# Altium PCB Industrial_IOT_Dev_Brd-v2.0.PcbDoc (part 1 of 5)
Units mil, origin at the board's own origin, x right, y up, seen from the top; angles counter-clockwise.
Board outline 3543.31 x 4724.41 mil, 2 copper layers (Top Layer, Bottom Layer), stack 61.889 mil thick; 159 components, 96 nets, 479 pads, 141 vias.
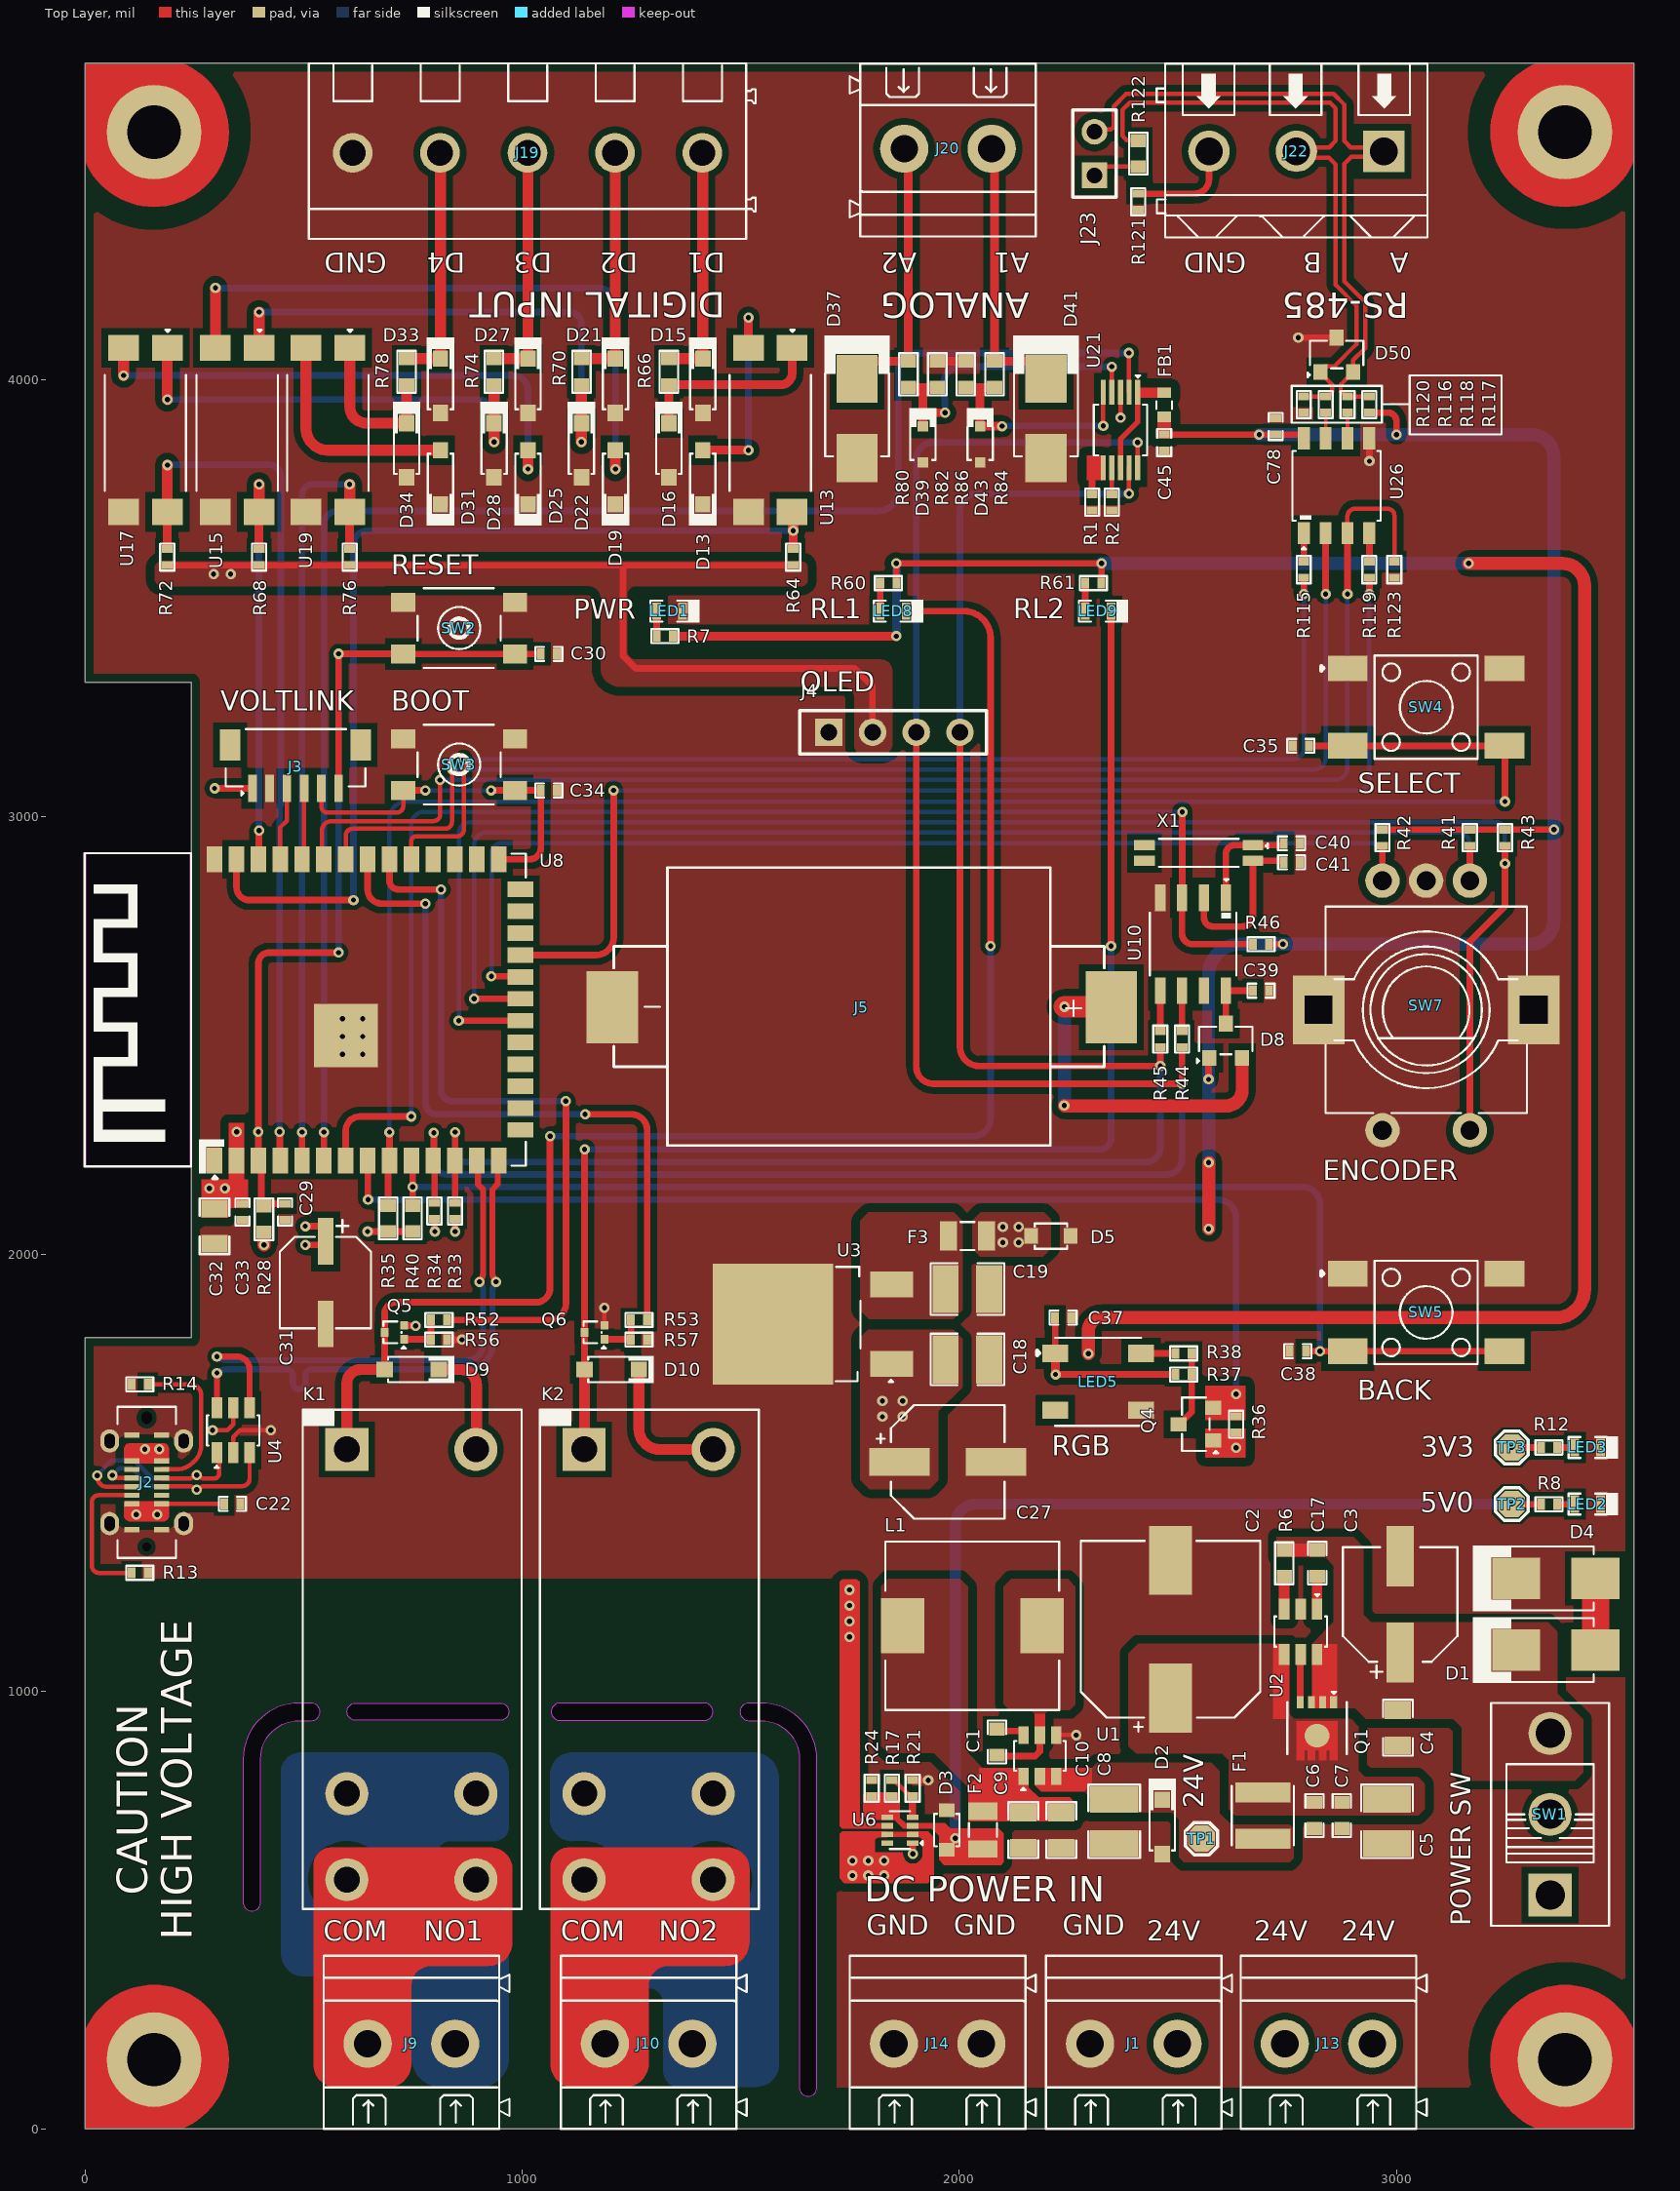
[diagram p0: Top Layer view]
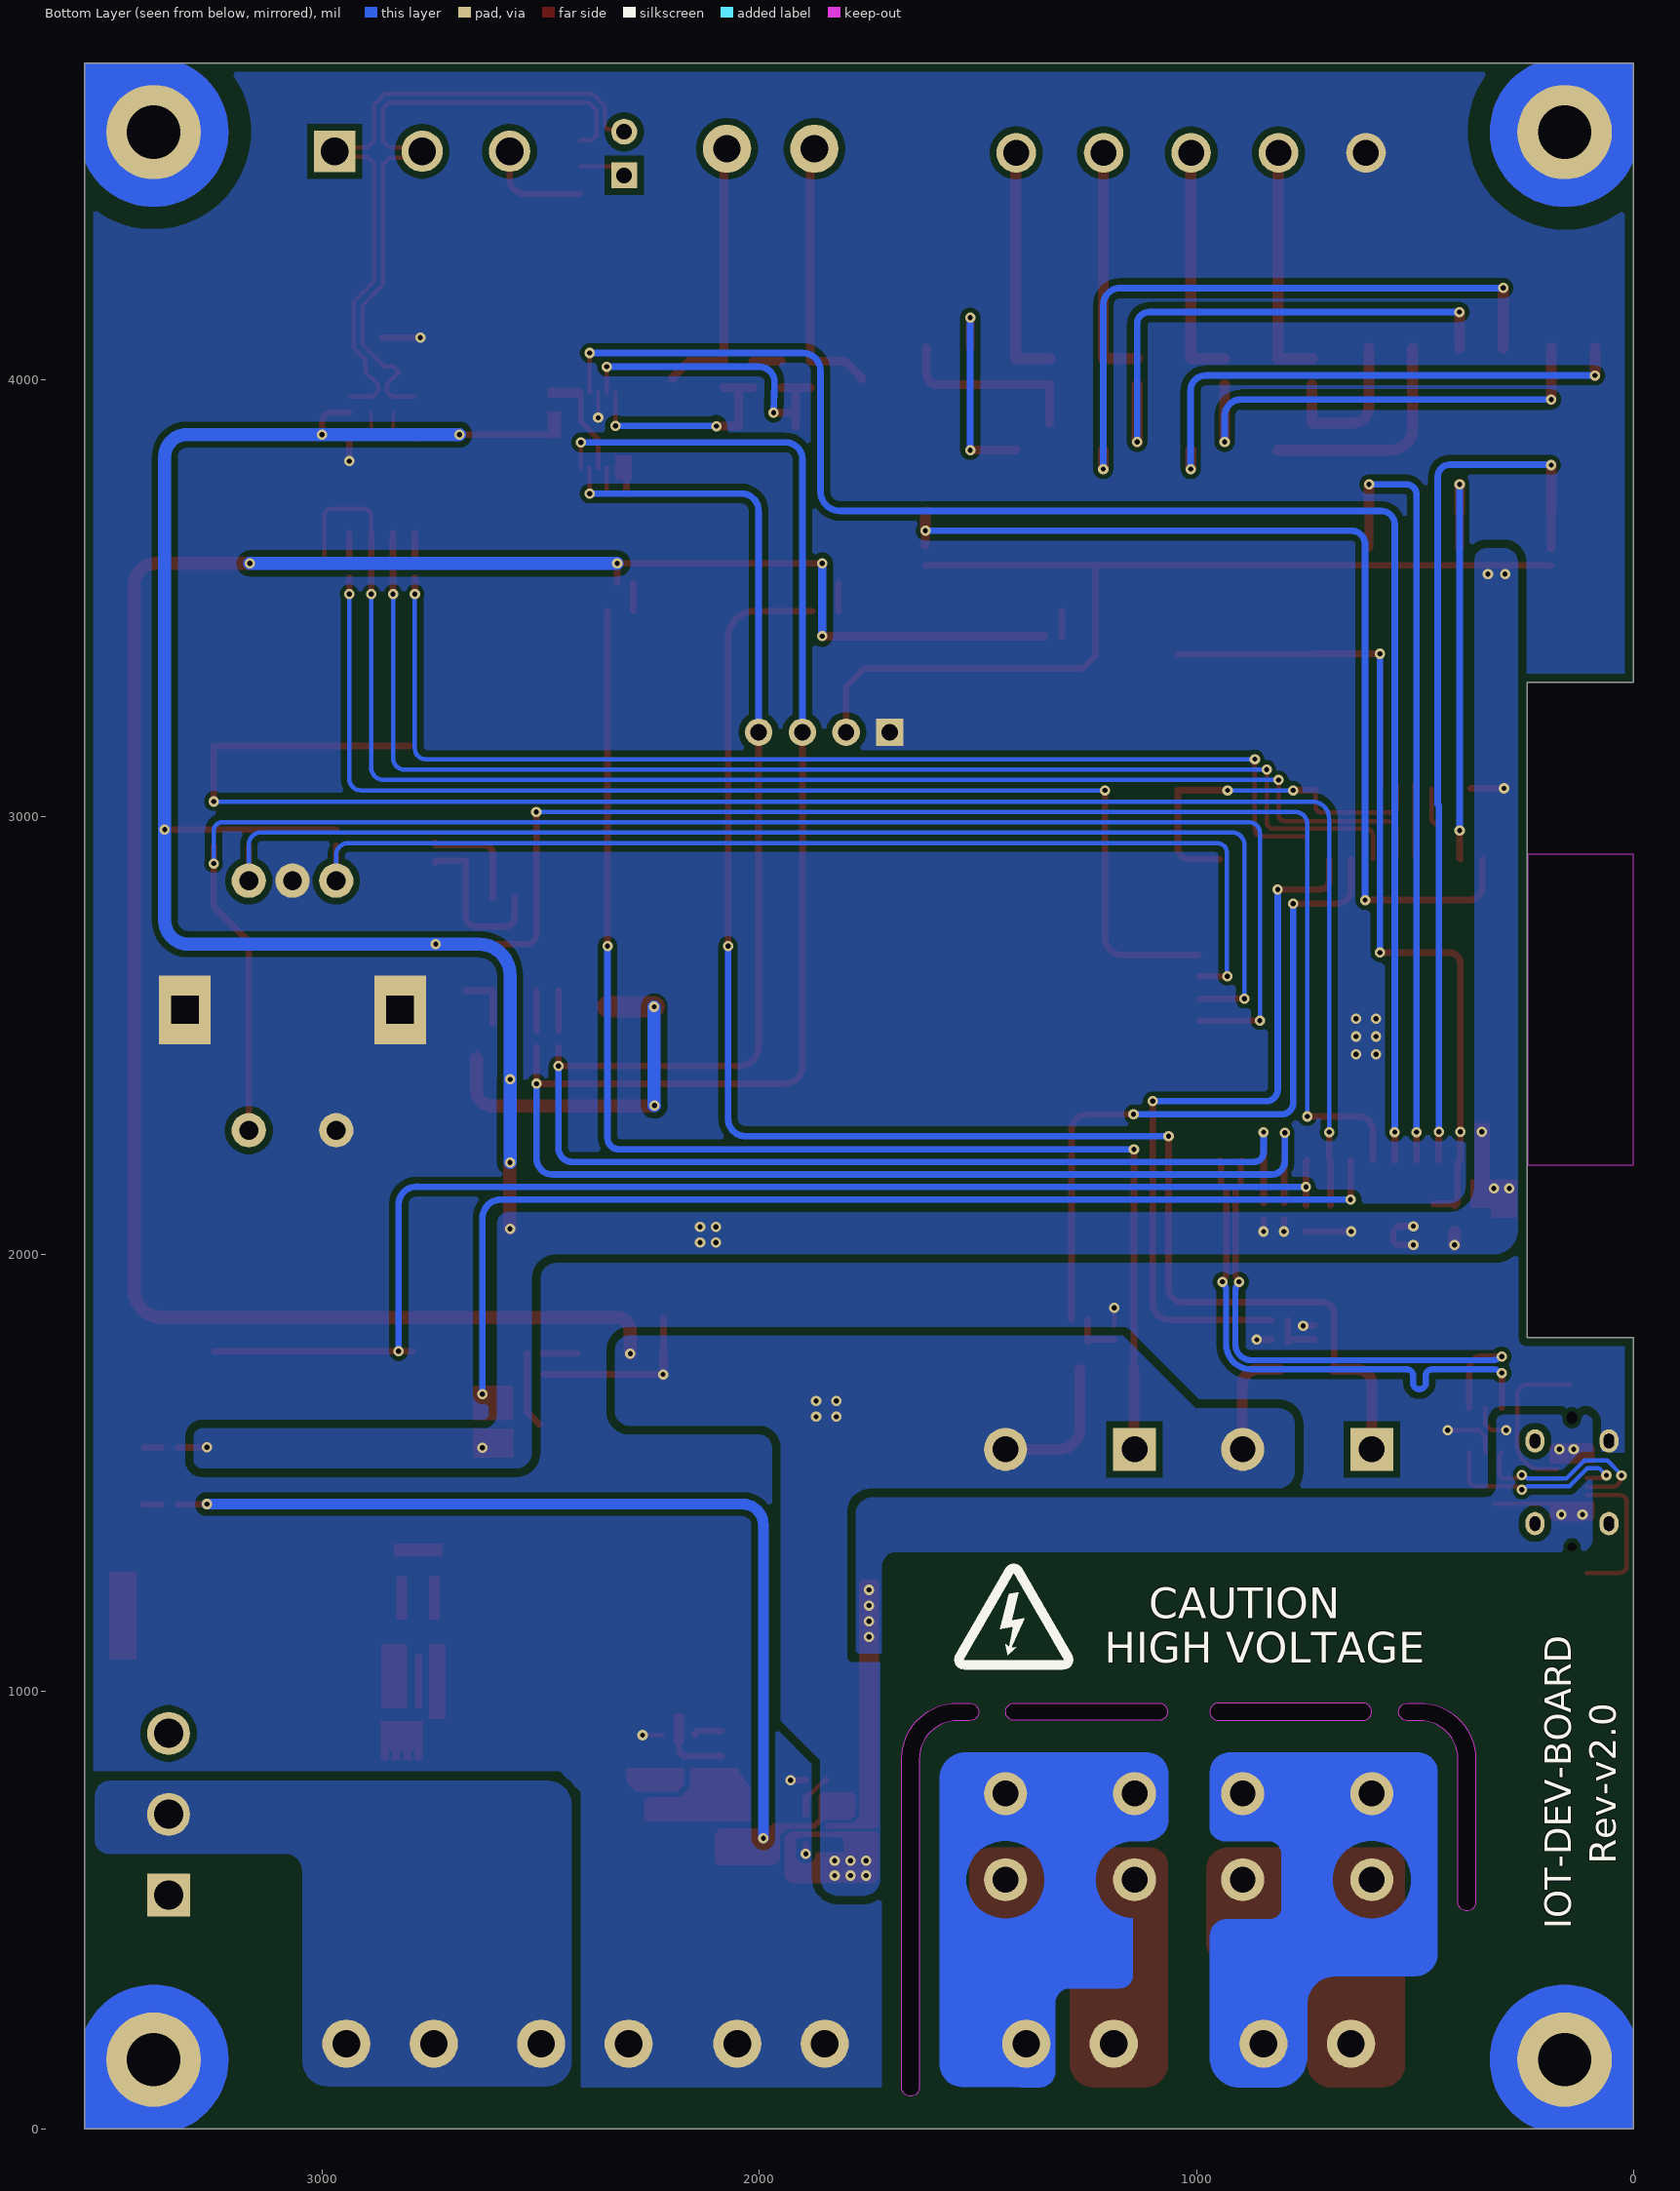
[diagram p1: Bottom Layer view, seen from below]
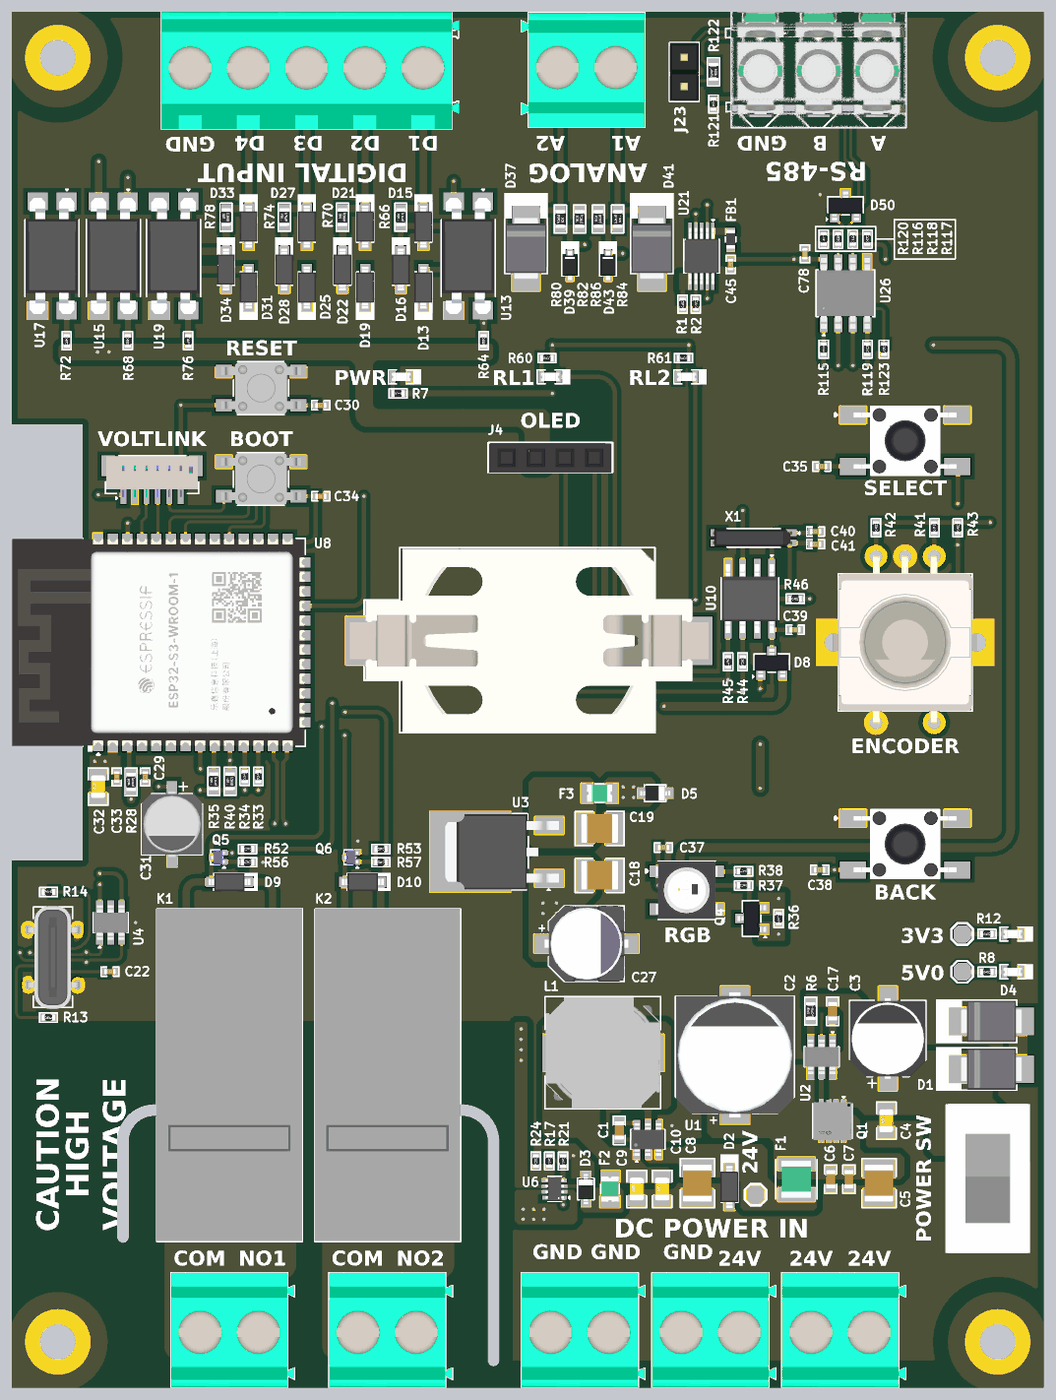
[diagram p4: 3D render of the assembled board from above, using the file's embedded part models]

## Layer stack, top to bottom
Top Solder: solder mask 1, SM-001, Dk 4.8
Top Layer: signal copper 1.417
Dielectric 1: dielectric 59.055, FR-4, Dk 4.8
Bottom Layer: signal copper 1.417
Bottom Solder: solder mask 1, SM-001, Dk 4.8

## Board outline
0,0 0,1809.66 243.39,1809.66 243.39,3308.25 0,3308.25 0,4724.41 3543.31,4724.41 3543.31,0
cut-out: 1498.22,952.93 ccw(c1517.91,952.93) 1517.91,933.25 1546.35,933.25 cw(c1546.35,845.5) 1634.1,845.5 1634.1,94.01 ccw(c1654.12,94.01) 1654.12,73.99 ccw(c1654.12,94.01) 1674.13,94.01 1674.13,845.5 ccw(c1546.35,845.5) 1546.35,973.28 1518.57,973.28 ccw(c1518.57,952.93)
cut-out: 361.62,517.71 ccw(c381.64,517.71) 381.64,497.69 ccw(c381.64,517.71) 401.65,517.71 401.65,845.5 cw(c489.4,845.5) 489.4,933.25 517.85,933.25 ccw(c517.85,952.93) 537.53,952.93 ccw(c517.19,952.93) 517.19,973.28 489.4,973.28 ccw(c489.4,845.5) 361.62,845.5
cut-out: 969.23,953.51 cw(c949.22,953.51) 949.22,933.5 619.55,933.5 cw(c619.55,953.51) 599.53,953.51 cw(c619.55,953.51) 619.55,973.53 949.22,973.53 cw(c949.22,953.51)
cut-out: 1066.52,953.51 ccw(c1086.54,953.51) 1086.54,933.5 1416.21,933.5 ccw(c1416.21,953.51) 1436.22,953.51 ccw(c1416.21,953.51) 1416.21,973.53 1086.54,973.53 ccw(c1086.54,953.51)

## Design rules (kind name [scope] priority, off if disabled: settings)
BoardOutlineClearance [All] p1: gap=0 ignorepadtopadclearanceinfootprint=FALSE except(10: Via-OutlineEdge; 20: Poly-OutlineEdge)
Clearance [All] p1: gap=10 ignorepadtopadclearanceinfootprint=FALSE except(4: SMDPad-SMDPad; 7: Arc-Arc Arc-Track Arc-SMDPad Arc-Fill Track-Track Track-SMDPad Track-Via Track-Fill Track-Region Track-Text SMDPad-Fill SMDPad-Region THPad-THPad Fill-Fill Fill-Region Region-Region; 15: Arc-Poly Track-Poly SMDPad-Poly THPad-Poly; 20: Fill-Poly Poly-Poly Poly-Region)
ComponentClearance [All] p1: gap=0 collisioncheckmode=3 verticalgap=0 showdistances=FALSE
DiffPairsRouting "DIFF_USB PRO" [InDifferentialPairClass('USB_PROGRAM_LINES')] p1: maxlimit=7 minlimit=7 mostfreqgap=7 toplayer_minwidth=14 toplayer_maxwidth=14 toplayer_prefwidth=14 bottomlayer_minwidth=14 bottomlayer_maxwidth=14 bottomlayer_prefwidth=14 impedanceprofiledriven=TRUE impedanceprofileid={8031B122-6700-4A9C-BC17-82BE1AD90A4A} impedanceprofilevalue=90.000000 maxuncoupledlength=500
DiffPairsRouting DIFF_USB [InDifferentialPairClass('USB')] p2: maxlimit=7 minlimit=7 mostfreqgap=7 toplayer_minwidth=10 toplayer_maxwidth=10 toplayer_prefwidth=10 bottomlayer_minwidth=10 bottomlayer_maxwidth=10 bottomlayer_prefwidth=10 impedanceprofiledriven=TRUE impedanceprofileid={FF5DAFE1-98B4-493E-B4A7-3D2591EC31F9} impedanceprofilevalue=90.000000 maxuncoupledlength=500
DiffPairsRouting DIFF_RS485 [InDifferentialPairClass('RS485')] p3: maxlimit=10 minlimit=10 mostfreqgap=10 toplayer_minwidth=10 toplayer_maxwidth=10 toplayer_prefwidth=10 bottomlayer_minwidth=10 bottomlayer_maxwidth=10 bottomlayer_prefwidth=10 impedanceprofiledriven=TRUE impedanceprofileid={AF431588-A3C0-40A6-A26B-CB03469C8758} impedanceprofilevalue=120.000000 maxuncoupledlength=500
HoleSize [All] p1: absolutevalues=TRUE maxlimit=137.8 minlimit=1 maxpercent=80.000 minpercent=20.000
MatchedLengths "Schematic Matched Net Lengths_1" [InNetClass('USB_PROGRAM')] p1: tolerance=50 checknetsindiffpair=TRUE checkdiffpairvsdiffpair=FALSE checkxsignals=FALSE checkothers=FALSE
MaxMinImpedance "Schematic Impedance Constraint" [InNetClass('USB_PROGRAM')] p1: minimum=85.00 maximum=90.00
MinimumSolderMaskSliver [All] p1: minsoldermaskwidth=0
PolygonConnect [All] p1: connectstyle=Direct reliefconductorwidth=10 reliefentries=4 polygonreliefangle="90 Angle" airgapwidth=10
RoutingVias [All] p1: holewidth=11.81 width=23.62 viastyle="Through Hole" minholewidth=11.81 minwidth=23.62 maxholewidth=11.81 maxwidth=23.62
SilkToSilkClearance [All] p1: silktosilkclearance=0
SilkToSolderMaskClearance [IsPad] p1: minsilkscreentomaskgap=0 clearancetoexposedcopper=TRUE
SolderMaskExpansion [All] p1: expansion=4 istentingtop=FALSE
SupplyNets "Schematic Supply Nets_17" [InNet('GND')] p1: voltage=0.000
SupplyNets "Schematic Supply Nets_16" [InNet('24V')] p2: voltage=0.000
SupplyNets "Schematic Supply Nets_15" [InNet('VIN')] p3: voltage=0.000
SupplyNets "Schematic Supply Nets_14" [InNet('3V3')] p4: voltage=0.000
SupplyNets "Schematic Supply Nets_11" [InNet('VBUS-TYPEC')] p5: voltage=0.000
SupplyNets "Schematic Supply Nets_9" [InNet('VCC')] p6: voltage=0.000
SupplyNets "Schematic Supply Nets_6" [InNet('5V-PWR')] p7: voltage=0.000
SupplyNets "Schematic Supply Nets_5" [InNet('5V')] p8: voltage=0.000
SupplyNets "Schematic Supply Nets_4" [InNet('3V3-FIL')] p9: voltage=0.000
Width [All] p1: maxlimit=50 minlimit=8 preferedwidth=8 minimp=50.000000 maximp=50.000000 favimp=50.000000
24 further rules are at their usual default settings.

## Classes and differential pairs
differential pair class USB: TYPEC_D
differential pair class USB_PROGRAM_LINES: TYPEC
net class USB_PROGRAM: TYPEC_N TYPEC_P
component class Terminal-Sheet: J13 J14
component class RS485-Sheet: C78 D50 J22 J23 R115 R116 R117 R118 R119 R120 R121 R122 R123 U26
component class Power-Sheet: C1 C2 C3 C4 C5 C6 C7 C8 C9 C10 C17 C18 C19 C22 C27 D1 D2 D3 D4 D5 F1 F2 F3 J1 J2 L1 LED1 LED2 LED3 Q1 R6 R7 R8 R12 R13 R14 R17 R21 R24 SW1 TP1 TP2 TP3 U1 U2 U3 U4 U6
component class Power-Relay-Sheet: D9 D10 J9 J10 K1 K2 LED8 LED9 Q5 Q6 R52 R53 R56 R57 R60 R61
component class Digital-Input-Sheet: D13 D15 D16 D19 D21 D22 D25 D27 D28 D31 D33 D34 J19 R64 R66 R68 R70 R72 R74 R76 R78 U13 U15 U17 U19
component class Controller-Sheet: C29 C30 C31 C32 C33 C34 C35 C37 C38 C39 C40 C41 D8 J3 J4 J5 LED5 Q4 R28 R33 R34 R35 R36 R37 R38 R40 R41 R42 R43 R44 R45 R46 SW2 SW3 SW4 SW5 SW7 U8 U10 X1
component class Analog-Input-Sheet: C45 D37 D39 D41 D43 FB1 J20 R1 R2 R80 R82 R84 R86 U21
differential pair class RS485: RS485
differential pair TYPEC: +TYPEC_P -TYPEC_N
differential pair TYPEC_D: +TYPEC_D_P -TYPEC_D_N
differential pair RS485: +RS485_P -RS485_N

## Components (designator, comment, footprint, x,y, rotation, side; value= is the part's Value field where it differs from the comment)
C1 "0.1uF" Cap-0603 2086.01,884.19 r90 top value=100nF
C2 "220uF" UCD-220uF-10mmDia 2483.1,1142.15 r90 top
C3 "47uF" RVT1H470M0607 3008.09,1199.24 r90 top
C4 "22nF" Cap-0805 3003.1,917 r90 top
C5 "10uF" Cap-1210 2978.14,702.76 r90 top
C6 "1uF" Cap-0603 2812.24,716.01 r90 top
C7 "0.1uF" Cap-0603 2874.7,716.01 r90 top value=100nF
C8 "10uF" Cap-1210 2354.1,702.76 r90 top
C9 "22uF" Cap-0805 2146.1,682.76 r90 top
C10 "22uF" Cap-0805 2233.31,682.76 r90 top
C17 "1uF" Cap-0603 2818.74,1293.25 r90 top
C18 "10uF" Cap-1210 2018.5,1759.45 r180 top
C19 "10uF" Cap-1210 2018.5,1920.18 r180 top
C22 "0.1uF" Cap-0402 337.13,1429.06 r0 top value=100nF
C27 "120uF" 20SVPF120M 1973.33,1525 r0 top
C29 "1uF" Cap-0402 457.79,2097 r90 top
C30 "0.1uF" Cap-0402 1061.12,3373.06 r180 top value=100nF
C31 "47uF" RVT1E470M0505 550,1935 r270 top
C32 "22uF" Cap-0805 296.42,2064 r90 top
C33 "0.1uF" Cap-0402 360.12,2097 r270 top value=100nF
C34 "0.1uF" Cap-0402 1061.12,3060.94 r180 top value=100nF
C35 "0.1uF" Cap-0402 2781.1,3162.74 r0 top value=100nF
C37 "0.1uF" Cap-0402 2237.62,1855 r0 top value=100nF
C38 "0.1uF" Cap-0402 2774.1,1778.21 r0 top value=100nF
C39 "0.1uF" Cap-0402 2690.04,2602.76 r180 top value=100nF
C40 "10pF" Cap-0402 2760,2939.72 r180 top
C41 "DNP" Cap-0402 2760,2896.28 r180 top value=10pF
C45 "0.1uF" Cap-0402 2468.47,3856.41 r270 top value=100nF
C78 "0.1uF" Cap-0402 2723.6,3893.41 r90 top value=100nF
D1 "SMBJ58A-13-F" SMB_ 3364.22,1094.41 r180 top
D2 "AZ4024-01G" SOD-123 2464.1,690 r90 top
D3 "PESD5V0S1BA,115-ES" "SOD-323 (Bi-directional)" 1971.1,682.77 r270 top
D4 "SMBJ26A-13-F" SMB_ 3364.22,1258.41 r180 top
D5 "PESD3V3L1BA-N-ES" "SOD-323 (Bi-directional)" 2209.37,2041.57 r180 top
D8 "BAT54C" SOT-23 2609.54,2488.01 r0 top
D9 "1N4148W-7-F" SOD-123 747.24,1736.37 r0 top value=2pF
D10 "1N4148W-7-F" SOD-123 1204.85,1736.37 r0 top value=2pF
D13 "1N4148W-7-F" SOD-123 1413.17,3777.12 r270 top value=2pF
D15 "AZ4024-01G" SOD-123 1413.2,3986.57 r90 top
D16 "BZT52C24" SOD-123 1335.6,3839.13 r90 top
D19 "1N4148W-7-F" SOD-123 1213.2,3777.12 r270 top value=2pF
D21 "AZ4024-01G" SOD-123 1213.2,3986.57 r90 top
D22 "BZT52C24" SOD-123 1135.59,3839.13 r90 top
D25 "1N4148W-7-F" SOD-123 1013.21,3777.12 r270 top value=2pF
D27 "AZ4024-01G" SOD-123 1013.2,3986.57 r90 top
D28 "BZT52C24" SOD-123 935.59,3839.13 r90 top
D31 "1N4148W-7-F" SOD-123 813.21,3777.12 r270 top value=2pF
D33 "AZ4024-01G" SOD-123 813.2,3986.57 r90 top
D34 "BZT52C24" SOD-123 735.59,3839.13 r90 top
D37 "SMBJ12A" SMB_ 1765.96,3911.84 r90 top
D39 "MM3Z3V3B" SOD323F 1916.53,3852.67 r90 top
D41 "SMBJ12A" SMB_ 2198.05,3911.88 r90 top
D43 "MM3Z3V3B" SOD323F 2047.47,3852.67 r90 top
D50 "SM712" SOT-23 2862.95,4057.26 r0 top
F1 "1210L075/24PR" FUSE-1210 2694.1,716 r270 top
F2 "0805L150SLYR" Fuse-0805 2054.1,682.77 r270 top
F3 "SMD0805B110TF" Fuse-0805 2018.5,2041.57 r0 top
FB1 "120R" "IND-0603 (1608 Metric)" 2468.47,3943 r270 top
J1 "DB128L-5.08-2P-GN-S" DB128L-5.08-2P-GN-S 2398.89,194.29 r180 top
J2 "U263-163N-4BQC65" U263-163N-4BQC65 141.02,1478.27 r90 top
J3 "Voltlink Target" "Voltlink Target" 481.42,3115.31 r0 top
J4 "PM2.54-1*4" "HDR1X4 Female" 1851.41,3193.94 r0 top
J5 "CR2032-BS-6-1" CR2032-BS-6-1 1776.65,2564.84 r0 top
J9 "DB128L-5.08-2P-GN-S" DB128L-5.08-2P-GN-S 746.57,194.29 r180 top
J10 "DB128L-5.08-2P-GN-S" DB128L-5.08-2P-GN-S 1289.19,194.29 r180 top
J13 "DB128L-5.08-2P-GN-S" DB128L-5.08-2P-GN-S 2844.52,194.29 r180 top
J14 "DB128L-5.08-2P-GN-S" DB128L-5.08-2P-GN-S 1950.3,194.29 r180 top
J19 "DB128V-5.08-5P-GN-S" DB128V-5.08-5P-GN-S 1012.2,4519.05 r180 top
J20 "DB128L-5.08-2P-GN-S" DB128L-5.08-2P-GN-S 1973.92,4528.7 r0 top
J22 "DB128L-5.08-3P-GN-S" DB128L-5.08-3P-GN-S 2971,4522.75 r180 top
J23 "X6511WV-02H-C60D30" HDR1X2_ 2309.1,4467.47 r90 top
K1 "G5RL-1A-E-HR-DC5" G5RL-1A-E-HR-DC5 746.57,1061.48 r270 top
K2 "G5RL-1A-E-HR-DC5" G5RL-1A-E-HR-DC5 1289.19,1061.48 r270 top
L1 "4.7uH" YSLF1045-4R7M 2029.65,1150 r180 top
LED1 "RED" LED-0603 1337.24,3470.72 r0 top
LED2 "RED" LED-0603 3437.39,1428.52 r0 top
LED3 "RED" LED-0603 3437.39,1558 r0 top
LED5 "WS2812B-XF02/W" WS2812B-XF02/W 2317.55,1708.19 r0 top
LED8 "Emerald" LED-0603 1848.55,3471 r0 top
LED9 "Emerald" LED-0603 2317.55,3470.99 r0 top
Q1 "DMT6007LFG-7" PowerDI-3333-8 2818.14,937 r270 top
Q4 "Si2302CDS" Sot-23 2541,1611.15 r90 top
Q5 "MMBT3904M" SOT-723 707.87,1821.37 r90 top
Q6 "MMBT3904M" SOT-723 1165.48,1821.37 r90 top
R1 "10K" Res-0402 2303.74,3720.01 r90 top
R2 "10K" Res-0402 2348.78,3720 r90 top
R6 "100K" Res-0603 2743.34,1293.25 r270 top
R7 "3.9K" Res-0402 1326.21,3413.72 r180 top value=3.9kR
R8 "499R" Res-0402 3348.74,1428.04 r0 top
R12 "240R" Res-0402 3348.74,1558 r0 top
R13 "5.1K" Res-0402 125.47,1271.25 r0 top
R14 "5.1K" Res-0402 125.47,1702.25 r180 top
R17 "3.3K" Res-0402 1845.79,778.49 r270 top
R21 "1K" Res-0402 1893.03,778.5 r270 top
R24 "DNP" Res-0402 1799.41,778.5 r270 top
R28 "10K" Res-0603 409.47,2080 r270 top
R33 "4.7K" Res-0402 846.42,2098.94 r270 top
R34 "4.7K" Res-0402 799.42,2098.94 r270 top
R35 "10K" Res-0603 693.42,2081.94 r270 top
R36 "10K" Res-0402 2633.11,1611.14 r270 top
R37 "10K" Res-0402 2513.02,1725 r180 top
R38 "75R" Res-0402 2513.02,1773.15 r180 top
R40 "10K" Res-0603 749.42,2081.94 r270 top
R41 "4.7K" Res-0402 3167.73,2952.77 r90 top
R42 "4.7K" Res-0402 2967.73,2952.77 r90 top
R43 "4.7K" Res-0402 3248.03,2952.76 r90 top
R44 "0R" Res-0402 2509.54,2492.32 r270 top
R45 "0R" Res-0402 2459.54,2492.32 r270 top
R46 "4.7K" Res-0402 2690.04,2709.06 r0 top
R52 "4.7K" Res-0402 809.73,1849.78 r180 top
R53 "4.7K" Res-0402 1267.35,1849.78 r180 top
R56 "47K" Res-0402 809.73,1804.46 r180 top
R57 "47K" Res-0402 1267.35,1804.46 r180 top
R60 "680R" Res-0402 1837.52,3535 r0 top
R61 "680R" Res-0402 2306.52,3535 r0 top
R64 "4.7K" Res-0402 1620,3594.5 r270 top
R66 "1.5K" Res-0603 1335.62,4018.57 r270 top
R68 "4.7K" Res-0402 398.2,3594.5 r270 top
R70 "1.5K" Res-0603 1135.62,4018.57 r270 top
R72 "4.7K" Res-0402 188.2,3594.5 r270 top
R74 "1.5K" Res-0603 935.62,4018.57 r270 top
R76 "4.7K" Res-0402 605.47,3594.5 r270 top
R78 "1.5K" Res-0603 735.62,4018.57 r270 top
R80 "3.74K" Res-0603 1883.58,4012.62 r90 top
R82 "1.8k" Res-0603 1949.49,4012.61 r270 top
R84 "3.74K" Res-0603 2080.43,4012.61 r90 top
R86 "1.8k" Res-0603 2014.52,4012.61 r270 top
R115 "0R" Res-0402 2787.81,3565.7 r90 top
R116 "0R" Res-0402 2837.81,3943.5 r90 top
R117 "4.7K" Res-0402 2937.81,3943.51 r90 top
R118 "0R" Res-0402 2887.81,3943.5 r90 top
R119 "0R" Res-0402 2937.81,3565.7 r90 top
R120 "4.7K" Res-0402 2787.81,3943.5 r90 top
R121 "0R" Res-0402 2409.1,4407.23 r90 top
R122 "120R" Res-0603 2409.1,4517.47 r90 top
R123 "10K" Res-0402 2995,3565.7 r270 top
SW1 "SS-12D10L9" SS-12D10L9 3351.25,718.83 r90 top
SW2 "TS-1109S-C-B" TS-1109S-C-B 855.93,3432.11 r180 top
SW3 "TS-1109S-C-B" TS-1109S-C-B 855.84,3120 r180 top
SW4 "TS-1002S-12026C" TS-1002S-12026C 3067.73,3251.33 r0 top
SW5 "TS-1002S-12026C" TS-1002S-12026C 3067.73,1866.8 r0 top
SW7 "EC11E1820402" EC11E1820402 3067.73,2568.9 r180 top
TP1 "TEST POINT" Test-point 2554.09,663.25 r0 top
TP2 "TEST POINT" Test-point 3263.68,1428.52 r0 top
TP3 "TEST POINT" Test-point 3263.68,1558 r0 top
U1 "AP63205WU-7" TSOT-23-6 2184.1,852.76 r90 top
U2 "LM74700QDBVRQ1" SOT-23-6 2780.74,1136.26 r270 top
U3 "AP7363-33D-13" TO-252-2L 1709.73,1840 r90 top
U4 "USBLC6-2SC6" SOT-23-6 339.1,1597.27 r90 top
U6 "TPS2116DRLR" SOT-583 1864.1,682.76 r180 top
U8 "ESP32-S3-WROOM-1-N16R8" "41-SMD Module" 646.02,2559.15 r90 top
U10 "PCF8563T/F4,118" "SOIC-8(0.154\", 3.90mm Width)" 2534.54,2709.06 r270 top
U13 "SFH617A-2X009T" SFH617A-2X009T 1567.47,3885.6 r270 top
U15 "SFH617A-2X009T" SFH617A-2X009T 348.2,3885.6 r270 top
U17 "SFH617A-2X009T" SFH617A-2X009T 138.2,3885.6 r270 top
U19 "SFH617A-2X009T" SFH617A-2X009T 555.47,3885.6 r270 top
U21 "ADS1115IDGSR" VSSOP-10 2368.47,3885 r270 top
U26 "SP3485EIM/TR" SOP-8 2862.81,3757.7 r90 top
X1 "32.768kHz" MC-146_ 2547.49,2918 r180 top

## Footprints (in the part's own frame and the unit in brackets; to place one, negate y for a bottom-side part, rotate by r counter-clockwise, add the part's x,y. Pads: shape width x height; smd on the part's side, far side on the other; paste and mask are expansions set on the pad)
20SVPF120M [mm]
  rect 3.5x1.6 smd: 1(-2.8,0) 2(2.8,0)
  silkscreen extent -4.11,-3.3 3.3,3.3, body extent -3.65,-3.3 3.65,3.3, height 5.9
"41-SMD Module" [mm]
  rect 1.5x0.9 smd: 1(-8.75,8.88) 2(-8.75,7.61) 3(-8.75,6.34) 4(-8.75,5.07) 5(-8.75,3.8) 6(-8.75,2.53) 7(-8.75,1.26) 8(-8.75,-0.01) 9(-8.75,-1.28) 10(-8.75,-2.55) 11(-8.75,-3.82) 12(-8.75,-5.09) 13(-8.75,-6.36) 14(-8.75,-7.63) 27(8.75,-7.63) 28(8.75,-6.36) 29(8.75,-5.09) 30(8.75,-3.82) 31(8.75,-2.55) 32(8.75,-1.28) 33(8.75,-0.01) 34(8.75,1.26) 35(8.75,2.53) 36(8.75,3.8) 37(8.75,5.07) 38(8.75,6.34) 39(8.75,7.61) 40(8.75,8.88)
  rect 0.9x1.5 smd: 15(-6.98,-8.88) 16(-5.71,-8.88) 17(-4.44,-8.88) 18(-3.17,-8.88) 19(-1.9,-8.88) 20(-0.63,-8.88) 21(0.64,-8.88) 22(1.91,-8.88) 23(3.18,-8.88) 24(4.45,-8.88) 25(5.72,-8.88) 26(6.99,-8.88)
  rect 3.7x3.7 smd: 41(-1.5,1.26)
  Keep-Out Layer region: -9.043,10.287 9.041,10.287 9.041,16.383 -9.043,16.383
  silkscreen extent -9.8,-9.2 9.09,16.43, body extent -9.01,-9.14 9.01,16.37, height 3.16
Cap-0402 [mil]
  rect 18x25 smd mask+2.36: 1(-18.5,0) 2(18.5,0)
  silkscreen extent -31,-16 31,16, body extent -20,-10 20,10, height 19
Cap-0603 [mil]
  rect 30x35 smd mask+2.36: 1(-30,0) 2(30,0)
  silkscreen extent -49,-21 49,21, body extent -32,-16 31,16, height 34
Cap-0805 [mil] "SMD 0805"
  rect 40x60 smd mask+2.76: 1(-40,0) 2(40,0)
  silkscreen extent -64,-34 64,34, body extent -39,-25 39,25, height 30
Cap-1210 [mil] "SMD 1210"
  rect 60x110 smd: 1(-50,0) 2(50,0)
  silkscreen extent -84,-59 84,59, body extent -63,-49 63,49, height 39
CR2032-BS-6-1 [mm]
  rect 3x4.2 smd: 1(14.5,0) 2(-14.5,0)
  silkscreen extent -14.41,-8.03 14.09,8.12, body extent -15.65,-8 15.65,8, height 5.6
DB128L-5.08-2P-GN-S [mm]
  round 2.8 hole 1.6: 1(-2.54,0) 2(2.54,0)
  silkscreen extent -5.7,-5.1 5.1,4.95, body extent -5.68,-5.12 5.08,4.88, height 14
DB128L-5.08-3P-GN-S [mm]
  rect 2.4x2.4 hole 1.6 paste-2539.97 mask+0.051: 1(0,0)
  round 2.4 hole 1.6 paste-2539.97 mask+0.051: 2(5.08,0) 3(10.16,0)
  silkscreen extent -2.54,-5.1 13.2,5, body extent -2.54,-5.1 13.2,5, height 14.1
DB128V-5.08-5P-GN-S [mm]
  round 2.3 hole 1.5 paste-2539.97 mask+0.05: 1(-10.16,0) 2(-5.08,0) 3(0,0) 4(5.08,0) 5(10.16,0)
  silkscreen extent -13.26,-5.2 12.7,5, body extent -13.3,-5.2 12.7,5, height 14
EC11E1820402 [mm]
  round 2 hole 1.1 paste-2539.97 mask+0.051: A(-2.54,-7.25) B(2.54,-7.25) C(0,-7.25) D(-2.54,7.25) E(2.54,7.25)
  rect 3x4 hole 1.6 square paste-2539.97 mask+0.051: F(6.25,0.25) G(-6.25,0.25)
  silkscreen extent -5.85,-5.75 5.85,6.25, body extent -6.29,-7.35 6.29,7.35, height 24.5
Fuse-0805 [mm]
  rect 1x1.7 smd: 1(-1.1,0) 2(1.1,0)
  silkscreen extent -0.41,-0.81 0.41,0.81, body extent -1.1,-0.75 1.1,0.75, height 1.24
FUSE-1210 [mm]
  rect 1.15x3.2 smd: 1(-1.34,0) 2(1.34,0)
  silkscreen extent -1.71,-1.8 1.71,1.8, body extent -1.61,-1.29 1.61,1.29, height 1.8
G5RL-1A-E-HR-DC5 [mm]
  rect 2.5x2.5 hole 1.5: 1(-12.501,-3.75)
  round 2.5 hole 1.5: 3(7.499,-3.75) 4(12.501,-3.75) 5(12.501,3.75) 6(7.499,3.75) 8(-12.501,3.75)
  silkscreen extent -14.8,-6.32 14.2,6.4, body extent -14.82,-6.34 14.18,6.37, height 16.2
HDR1X2_ [mm] "CONN HEADER VERT 2POS 2.54MM"
  rect 1.5x1.5 hole 0.9: 1(0,0)
  round 1.5 hole 0.9: 2(2.54,0)
  silkscreen extent -1.27,-1.27 3.81,1.27, body extent -1.27,-1.27 3.81,1.27, height 8.44
"HDR1X4 Female" [mm]
  rect 1.6x1.6 hole 0.95: 1(-3.81,0)
  round 1.6 hole 0.95: 2(-1.27,0) 3(1.27,0) 4(3.81,0)
  silkscreen extent -5.49,-1.27 5.36,1.27, body extent -5.38,-1.3 5.28,1.24, height 8.5
"IND-0603 (1608 Metric)" [mm] "0.063\" L x 0.032\" W (1.60mm x 0.80mm)"
  rect 0.6x0.8 smd: 1(-0.7,0) 2(0.7,0)
  silkscreen extent -0.2,-0.46 0.23,0.46, body extent -0.8,-0.4 0.8,0.4, height 0.78
LED-0603 [mm]
  rect 0.5x1 smd: 1(-0.75,0) 2(0.75,0)
  silkscreen extent -1.12,-0.66 1.75,0.66, body extent -0.82,-0.37 0.82,0.36, height 0.68
MC-146_ [mm]
  rect 1.2x0.6 smd: 1(-3.15,-0.45) 2(3.15,-0.45) 3(3.15,0.45) 4(-3.15,0.45)
  silkscreen extent -4.01,-0.81 2.31,0.81, body extent -3.35,-0.75 3.55,0.75, height 1.45
PowerDI-3333-8 [mm]
  rect 0.7x0.42 smd paste-100 mask+0.05: 1(-0.97,0.975) 2(-0.97,0.325) 3(-0.97,-0.325) 4(-0.97,-0.975)
  oval 1.35x1.44 smd: 5(0.97,0)
  Top Layer region: 0.14,1.2 2.39,1.2 2.39,0.75 1.8,0.75 1.8,0.55 2.39,0.55 2.39,0.1 1.8,0.1 1.8,-0.1 2.39,-0.1 2.39,-0.55 1.8,-0.55 1.8,-0.75 2.39,-0.75 2.39,-1.2 0.14,-1.2 0.14,1.2
  silkscreen extent -1.59,-1.73 2.03,1.73, body extent -1.12,-1.66 2.2,1.66, height 0.81
Res-0402 [mil]
  rect 18x25 smd mask+2.17: 1(-18.5,0) 2(18.5,0)
  silkscreen extent -32,-17 32,16, body extent -23,-11 23,11, height 16
Res-0603 [mil]
  rect 30x35 smd: 1(-30,0) 2(30,0)
  silkscreen extent -48,-21 48,21, body extent -31,-17 31,17, height 18
RVT1E470M0505 [mm]
  rect 2.7x0.91 smd paste+0 mask+0.051: 1(-2.4,0) 2(2.4,0)
  silkscreen extent -3.64,-2.65 2.66,2.65, body extent -2.85,-2.65 2.85,2.65, height 5.4
RVT1H470M0607 [mm]
  rect 3.5x1.6 smd: 1(-2.8,0) 2(2.8,0)
  silkscreen extent -4.27,-3.33 3.32,3.33, body extent -3.5,-3.3 3.5,3.3, height 7.7
SFH617A-2X009T [mm]
  rect 1.52x1.78 smd mask+0.07: 1(-4.765,1.27) 2(-4.765,-1.27) 3(4.765,-1.27) 4(4.765,1.27)
  silkscreen extent -5.81,-2.36 3.53,2.36, body extent -5.08,-2.29 5.08,2.29, height 3.75
SMB_ [mm]
  rect 2.8x2.4 smd: 1(-2.3,0) 2(2.3,0)
  silkscreen extent -2.21,-1.91 4.83,1.91, body extent -2.7,-1.8 2.7,1.8, height 2.3
SOD323F [mm]
  rect 0.6x0.6 smd: 1(-1.05,0) 2(1.05,0)
  silkscreen extent -0.91,-0.79 2.11,0.79, body extent -1.25,-0.67 1.25,0.68, height 1
SOD-123 [mm]
  rect 0.95x0.9 smd: 1(-1.575,0) 2(1.575,0)
  silkscreen extent -1.37,-0.8 2.82,0.8, body extent -1.82,-0.77 1.83,0.78, height 1.5
"SOD-323 (Bi-directional)" [mm]
  rect 0.8x0.9 smd mask+0.055: 1(-1.15,0) 2(1.15,0)
  silkscreen extent -0.94,-0.74 0.94,0.74, body extent -1.3,-0.67 1.3,0.67, height 1.1
"SOIC-8(0.154\", 3.90mm Width)" [mm]
  rect 1.55x0.6 smd: 1(-2.7,1.905) 2(-2.7,0.635) 3(-2.7,-0.635) 4(-2.7,-1.905) 5(2.7,-1.905) 6(2.7,-0.635) 7(2.7,0.635) 8(2.7,1.905)
  silkscreen extent -3.79,-2.51 1.8,2.51, body extent -3.01,-2.45 3.01,2.45, height 1.63
SOP-8 [mm]
  rect 1.3x0.7 smd: 1(-2.75,1.905) 2(-2.75,0.635) 3(-2.75,-0.635) 4(-2.75,-1.905) 5(2.75,-1.905) 6(2.75,-0.635) 7(2.75,0.635) 8(2.75,1.905)
  silkscreen extent -3.69,-2.57 2.03,2.57, body extent -3.1,-2.5 3.1,2.5, height 1.76
SOT-23 [mm] "TRANS NPN 40V 0.6A SOT23"
  rect 0.82x0.92 smd: 1(-0.95,-1) 2(0.95,-1) 3(0,1)
  silkscreen extent -1.68,-1.3 1.55,0.81, body extent -1.5,-1.25 1.5,1.25, height 1.05
Sot-23 [mm] "TRANS NPN 40V 0.6A SOT23"
  rect 0.82x0.92 smd: 1(-0.95,-1) 2(0.95,-1) 3(0,1)
  silkscreen extent -1.68,-1.3 1.55,0.81, body extent -1.5,-1.25 1.5,1.25, height 1.05
SOT-23-6 [mm]
  rect 1.22x0.62 smd: 1(-1.31,0.95) 2(-1.31,0) 3(-1.31,-0.95) 4(1.31,-0.95) 5(1.31,0) 6(1.31,0.95)
  silkscreen extent -2.18,-1.52 0.86,1.52, body extent -1.5,-1.5 1.5,1.5, height 1.47
SOT-583 [mm]
  rect 0.67x0.32 smd mask+0.055: 1(-0.735,0.75) 2(-0.735,0.25) 3(-0.735,-0.25) 4(-0.735,-0.75) 5(0.735,-0.75) 6(0.735,-0.25) 7(0.735,0.25) 8(0.735,0.75)
  silkscreen extent -1.32,-1.1 0.6,1.1, body extent -0.8,-1.05 0.8,1.05, height 0.6
SOT-723 [mm]
  rect 0.5x0.45 smd: 1(-0.4,-0.575) 2(0.4,-0.575) 3(0,0.575)
  silkscreen extent -0.94,-0.66 0.63,0.63, body extent -0.6,-0.6 0.6,0.6, height 0.5
SS-12D10L9 [mm]
  rect 2.5x2.5 hole 1.7 paste-2539.97 mask+0.051: 1(-4.7,0)
  round 2.5 hole 1.7 paste-2539.97 mask+0.051: 2(0,0) 3(4.7,0)
  silkscreen extent -6.48,-3.43 6.48,3.43, body extent -6.5,-3.7 6.5,3.7, height 16
Test-point [mil]
  oct 60x60 smd: 1(0,0)
  silkscreen extent -37,-37 37,37
TO-252-2L [mm]
  rect 1.5x2.5 smd: 1(-2.3,-3.45) 3(2.3,-3.45)
  rect 7x7 smd: 2(0,3.45)
  silkscreen extent -3.35,-3.53 3.33,-0.2, body extent -3.27,-4.31 3.27,5.63, height 2.34
TS-1002S-12026C [mm]
  rect 2.3x1.5 smd: 1(-4.55,2.25) 2(4.55,2.25) 3(-4.55,-2.25) 4(4.55,-2.25)
  silkscreen extent -6.1,-3 3,3, body extent -4.5,-3 4.5,3, height 12
TS-1109S-C-B [mm]
  rect 1.4x1.1 smd: 1(-3.25,-1.5) 2(3.25,-1.5) 3(3.25,1.5) 4(-3.25,1.5)
  silkscreen extent -2.41,-2.31 2.41,2.31, body extent -3.5,-2.25 3.5,2.25, height 4.3
TSOT-23-6 [mm]
  rect 1x0.6 smd: 1(-1.2,0.95) 2(-1.2,0) 3(-1.2,-0.95) 4(1.2,-0.95) 5(1.2,0) 6(1.2,0.95)
  silkscreen extent -1.98,-1.5 0.86,1.5, body extent -1.41,-1.45 1.41,1.45, height 1
U263-163N-4BQC65 [mm]
  rect 0.3x0.87 smd: A1(-2.75,0.865) A4(-1.25,0.865) A5(-0.75,0.865) A6(-0.25,0.865) A7(0.25,0.865) A8(0.75,0.865) A9(1.25,0.865) A12(2.75,0.865) B1(2.75,-0.865) B4(1.25,-0.865) B5(0.75,-0.865) B6(0.25,-0.865) B7(-0.25,-0.865) B8(-0.75,-0.865) B9(-1.25,-0.865) B12(-2.75,-0.865)
  round 0 hole 0.52 unplated: MH(-3.75,0)
  round 0 hole 0.6 slot 0.72 at 0 deg unplated: MH(3.75,0)
  oval 1.35x1.1 hole 0.6 slot 0.85 at 0 deg: S1(-2.4,2.15) S2(2.4,2.15) S3(2.4,-2.15) S4(-2.4,-2.15)
  silkscreen extent -4.39,-1.7 4.39,1.7, body extent -4.49,-2.28 4.45,2.32, height 6.55
UCD-220uF-10mmDia [mm] "0.406\" L x 0.406\" W (10.30mm x 10.30mm)"
  rect 4x2.5 smd: 1(-4,0) 2(4,0)
  silkscreen extent -5.95,-5.21 5.13,5.21, body extent -5.45,-5.15 5.45,5.15, height 10.8
"Voltlink Target" [mm]
  rect 0.5x1.6 smd: 1(-2.5,-1.263) 2(-1.5,-1.263) 3(-0.5,-1.263) 4(0.5,-1.263) 5(1.5,-1.263) 6(2.5,-1.263)
  rect 1.2x1.8 smd: MP1(-3.8,1.263) MP2(3.8,1.263)
  silkscreen extent -4.06,-1.68 4.06,2.17, body extent -4,-1.49 4,2.11, height 4.25
VSSOP-10 [mm]
  rect 1.45x0.3 smd paste+0 mask+0.05: 1(-2.2,1) 2(-2.2,0.5) 3(-2.2,0) 4(-2.2,-0.5) 5(-2.2,-1) 6(2.2,-1) 7(2.2,-0.5) 8(2.2,0) 9(2.2,0.5) 10(2.2,1)
  silkscreen extent -3.17,-1.55 1.47,1.55, body extent -2.45,-1.5 2.45,1.5, height 1.07
WS2812B-XF02/W [mm]
  rect 1.5x1 smd: 1(-2.5,1.65) 2(-2.5,-1.65) 3(2.5,-1.65) 4(2.5,1.65)
  silkscreen extent -3.56,-2.55 2.5,2.55, body extent -2.7,-2.5 2.7,2.5, height 1.55
YSLF1045-4R7M [mm]
  rect 2.5x3.2 smd: 1(-4.05,0) 2(4.05,0)
  silkscreen extent -5.05,-4.9 5.05,4.9, body extent -5,-4.85 5,4.85, height 4.5

## Part data
C1 C7: library part CL10B104KB8WPNC, "CAP CER 0.1UF 50V X7R 0603", Case Code (Imperial)=0603, Case Code (Metric)=1608, LCSC Part Number=C307348, Max Operating Temperature=125°C, Min Operating Temperature=-55°C, Ratings=AEC-Q200, Supplier Part Number=2575919, Tolerance=10%, Voltage Rating=50V, Case/Package=0603, Category="Ceramic Capacitors", ComponentLink1Description=LCSC, ComponentLink2Description=http://www.farnell.com/datasheets/2710560.pdf?src-supplier=Farnell, ComponentLink2URL=http://www.farnell.com/datasheets/2710560.pdf?src-supplier=Farnell, ComponentLink3Description=http://www.samsungsem.com/kr/support/product-search/mlcc/CL10B104KB8WPNC.jsp?src-supplier=Digi-Key, ComponentLink3URL=http://www.samsungsem.com/kr/support/product-search/mlcc/CL10B104KB8WPNC.jsp?src-supplier=Digi-Key, ComponentLink4Description=http://www.farnell.com/datasheets/2710560.pdf?src-supplier=Element14, ComponentLink4URL=http://www.farnell.com/datasheets/2710560.pdf?src-supplier=Element14, ComponentLink5Description=https://datasheet.octopart.com/CL10B104KB8WPNC-Samsung-Electro-Mechanics-datasheet-120093645.pdf?src-supplier=Future+Electronics, ComponentLink5URL=https://datasheet.octopart.com/CL10B104KB8WPNC-Samsung-Electro-Mechanics-datasheet-120093645.pdf?src-supplier=Future+Electronics, ComponentLink6Description=http://www.farnell.com/datasheets/2710560.pdf?src-supplier=Newark, ComponentLink6URL=http://www.farnell.com/datasheets/2710560.pdf?src-supplier=Newark, ComponentLink7Description=http://www.samsungsem.com/servlet/FileDownload?type=spec&file=CL10B104KB8WPNC.pdf&src-supplier=Avnet, ComponentLink7URL=http://www.samsungsem.com/servlet/FileDownload?type=spec&file=CL10B104KB8WPNC.pdf&src-supplier=Avnet, ComponentLink8Description=https://datasheet.octopart.com/CL10B104KB8WPNC-Samsung-datasheet-8326407.pdf?src-supplier=TME, ComponentLink8URL=https://datasheet.octopart.com/CL10B104KB8WPNC-Samsung-datasheet-8326407.pdf?src-supplier=TME, Height=900um, Item Type=Capacitor, Lead Free=5697LeadFree, Material=4241ConductorMaterial, Mounting Technology="Surface Mount", Packaging="Cut Tape", Pricing="100=0.021, 500=0.019, 1000=0.015, 2000=0.01 (GBP)", RoHS=Yes, RoHS Compliant=Yes, Series=CL, Stock=400, Supplier=Rs, Voltage Rating (DC)=50V
C2: library part UCD1H221MNL1GS, "CAP ALUM 220UF 20% 50V SMD", Case/Package=Radial, LCSC Part Number=C116211, Leakage Current=3uA, Manufacturer=Nichicon, Max Operating Temperature=105°C, Min Operating Temperature=-55°C, Package Quantity=1, Ripple Current=700mA, Supplier Part Number 1=493-6390-1-ND, Tolerance=20%, Voltage=50V, Capacitance=220uF, Category="Aluminum Electrolytic Capacitors", ComponentLink1Description=https://datasheet.ciiva.com/11776/0900766b80ebdadd-11776792.pdf?src-supplier=RSComponents, ComponentLink1URL=https://datasheet.ciiva.com/11776/0900766b80ebdadd-11776792.pdf?src-supplier=RSComponents, ComponentLink2Description=https://datasheet.ciiva.com/5362/e-cd-22158-5362489.pdf?src-supplier=Mouser, ComponentLink2URL=https://datasheet.ciiva.com/5362/e-cd-22158-5362489.pdf?src-supplier=Mouser, ComponentLink3Description=https://datasheet.ciiva.com/11684/e-cd-11684678.pdf?src-supplier=Avnet, ComponentLink3URL=https://datasheet.ciiva.com/11684/e-cd-11684678.pdf?src-supplier=Avnet, ComponentLink4Description=https://datasheet.ciiva.com/15037/e-cd-15037119.pdf?src-supplier=Digi-Key, ComponentLink4URL=https://datasheet.ciiva.com/15037/e-cd-15037119.pdf?src-supplier=Digi-Key, ComponentLink5Description=https://datasheet.ciiva.com/16393/e-cd-16393493.pdf?src-supplier=Future+Electronics, ComponentLink5URL=https://datasheet.ciiva.com/16393/e-cd-16393493.pdf?src-supplier=Future+Electronics, ComponentLink6Description=https://datasheet.ciiva.com/17354/e-cd-17354606.pdf?src-supplier=Avnet+Europe, ComponentLink6URL=https://datasheet.ciiva.com/17354/e-cd-17354606.pdf?src-supplier=Avnet+Europe, Construction=Cylindrical, Diameter=10mm, Dissipation Factor=0.1%, Features="General Purpose", Height=10mm, Height - Seated (Max)=0.394inch, Impedance=160mR, Item Type=Capacitor, Lead Free="Lead Free", Length=10mm, Life (Hours)=5000Hour, Manufacturer Part Number=UCD1H221MNL1GS, Mount="Surface Mount,PCB", Packaging="Tape and Reel", Pricing 1="1=0.85000, 10=0.60200, 50=0.45480, 100=0.39620 (USD)", Radiation Hardening=No, RoHS=Yes, RoHS Compliant=Yes, Series=CD, Supplier 1=Digi-Key, Termination=SMD/SMT, Voltage Rating=50V, Voltage Rating (DC)=50V
C3: library part RVT1H470M0607, "47uF 50V 66mA@120Hz ±20% SMD,D6.3xL7.7mm Aluminum Electrolytic Capacitors - SMD ROHS", LCSC Part Number=C72523, Manufacturer=ROQANG, Package=SMD,D6.3xL7.7mm, ComponentLink1Description=LCSC, ComponentLink1URL=https://www.lcsc.com/product-detail/Aluminum-Electrolytic-Capacitors-SMD_ROQANG-RVT1H470M0607_C72523.html, Item Type=Capacitor, Manufacturer Part Number=RVT1H470M0607
C4: library part CC0805JRX7R0BB223, "CAP CER 0.022UF 100V X7R 0805", Case/Package=0805, Dielectric=X7R, LCSC Part Number=C576993, Manufacturer=Yageo, Max Operating Temperature=125°C, Min Operating Temperature=-55°C, Tolerance=5%, ComponentLink1Description=https://datasheet.ciiva.com/11494/upy-np0x7r-mv-100-to-630v-9-11494760.pdf?src-supplier=Avnet, ComponentLink1URL=https://datasheet.ciiva.com/11494/upy-np0x7r-mv-100-to-630v-9-11494760.pdf?src-supplier=Avnet, Construction=Flat, Depth=1.25mm, Height=0.85mm, Item Type=Capacitors, Length=2mm, Manufacturer Part Number=CC0805JRX7R0BB223, Mounting Technology="Surface Mount", Pricing="1=0.13, 10=0.07, 50=0.0488, 100=0.0421, 500=0.03086, 1000=0.02736 (USD)", RoHS=Yes, RoHS Compliant=Yes, Stock=2257, Supplier=Digikey
C5 C18 C19: library part GRM32ER71H106KA12L, "CAP CER 10UF 50V X7R 1210", LCSC Part Number=C77102, Manufacturer=Murata, ComponentLink1Description=https://datasheet.ciiva.com/16497/product-16497010.pdf?src-supplier=Future+Electronics, ComponentLink1URL=https://datasheet.ciiva.com/16497/product-16497010.pdf?src-supplier=Future+Electronics, ComponentLink2Description=https://datasheet.ciiva.com/3777/4286grm32er71h106ka1223-3777306.pdf?src-supplier=Arrow+Electronics, ComponentLink2URL=https://datasheet.ciiva.com/3777/4286grm32er71h106ka1223-3777306.pdf?src-supplier=Arrow+Electronics, ComponentLink3Description=https://datasheet.ciiva.com/11789/0900766b80ef921d-11789081.pdf?src-supplier=Rs, ComponentLink3URL=https://datasheet.ciiva.com/11789/0900766b80ef921d-11789081.pdf?src-supplier=Rs, ComponentLink4Description=https://datasheet.ciiva.com/11607/c02e-11607596.pdf?src-supplier=Avnet, ComponentLink4URL=https://datasheet.ciiva.com/11607/c02e-11607596.pdf?src-supplier=Avnet, ComponentLink5Description=https://datasheet.ciiva.com/6270/partnumbering-e-01-6270167.pdf?src-supplier=Digikey, ComponentLink5URL=https://datasheet.ciiva.com/6270/partnumbering-e-01-6270167.pdf?src-supplier=Digikey, ComponentLink6Description=https://datasheet.ciiva.com/6270/partnumbering-e-01-6270168.pdf?src-supplier=Digikey, ComponentLink6URL=https://datasheet.ciiva.com/6270/partnumbering-e-01-6270168.pdf?src-supplier=Digikey, ComponentLink7Description=https://datasheet.ciiva.com/6270/partnumbering-e-01-6270169.pdf?src-supplier=Digikey, ComponentLink7URL=https://datasheet.ciiva.com/6270/partnumbering-e-01-6270169.pdf?src-supplier=Digikey, ComponentLink8Description=https://datasheet.ciiva.com/46441/1754714-46441340.pdf?src-supplier=Element14, ComponentLink8URL=https://datasheet.ciiva.com/46441/1754714-46441340.pdf?src-supplier=Element14, Item Type=Capacitors, Lead Free=5697LeadFree, Manufacturer Part Number=GRM32ER71H106KA12L, Pricing="1000=0.325, 2000=0.32, 3000=0.315, 4000=0.315, 5000=0.305 (USD)", RoHS=Yes, RoHS Compliant=5897YesNo, Stock=960000, Supplier="Future Electronics"
C6 C17: library part CL10A105KB8NNNC, "CAP CER 1UF 50V X5R 0603", Case Code (Imperial)=0603, Case Code (Metric)=1608, Dielectric=X5R, LCSC Part Number=C15849, Manufacturer=Samsung, Max Operating Temperature=85°C, Min Operating Temperature=-55°C, Tolerance=10%, Voltage Rating=50V, Case/Package=0603, Category="Ceramic Capacitors", ComponentLink1Description=https://datasheet.ciiva.com/26877/getdatasheetpartid-753736-26877879.pdf?src-supplier=Verical, ComponentLink1URL=https://datasheet.ciiva.com/26877/getdatasheetpartid-753736-26877879.pdf?src-supplier=Verical, Depth=0.8mm, Item Type=Capacitor, Length=1.6mm, Manufacturer Part Number=CL10A105KB8NNNC, Material=4241ConductorMaterial, Mounting Technology="Surface Mount", Packaging="Tape and Reel", Pricing="4000=0.01632, 8000=0.01595, 16000=0.01557, 24000=0.0152, 32000=0.01482 (USD)", Radiation Hardening=No, RoHS=Yes, RoHS Compliant=Yes, Series=CL, Stock=780446, Supplier=Avnet, Supplier Part Number=CL10A105KB8NNNC, Voltage Rating (DC)=50V
C8: library part CC1210KKX7R9BB106, "CAP CER 10UF 50V X7R 1210", Case Code (Imperial)=1210, Case Code (Metric)=3225, Dielectric=X7R, LCSC Part Number=C596319, Manufacturer=Yageo, Max Operating Temperature=125°C, Min Operating Temperature=-55°C, Tolerance=10%, Voltage Rating=50V, Case/Package=1210, ComponentLink1Description=https://datasheet.octopart.com/CC1210KKX7R9BB106-Yageo-datasheet-147453679.pdf?src-supplier=Newark, ComponentLink1URL=https://datasheet.octopart.com/CC1210KKX7R9BB106-Yageo-datasheet-147453679.pdf?src-supplier=Newark, ComponentLink2Description=https://datasheet.octopart.com/CC1210KKX7R9BB106-Yageo-datasheet-166511530.pdf?src-supplier=Future+Electronics, ComponentLink2URL=https://datasheet.octopart.com/CC1210KKX7R9BB106-Yageo-datasheet-166511530.pdf?src-supplier=Future+Electronics, ComponentLink3Description=http://www.yageo.com/documents/recent/UPY-GPHC_X7R_6.3V-to-50V_18.pdf?src-supplier=Digikey, ComponentLink3URL=http://www.yageo.com/documents/recent/UPY-GPHC_X7R_6.3V-to-50V_18.pdf?src-supplier=Digikey, ComponentLink4Description=http://www.yageo.com/exep/pages/download/literatures/ProductSelectionGuide%202014_Final_2.pdf?src-supplier=Digikey, ComponentLink4URL=http://www.yageo.com/exep/pages/download/literatures/ProductSelectionGuide%202014_Final_2.pdf?src-supplier=Digikey, ComponentLink5Description=https://datasheet.octopart.com/CC1210KKX7R9BB106-Yageo-datasheet-151948686.pdf?src-supplier=Farnell, ComponentLink5URL=https://datasheet.octopart.com/CC1210KKX7R9BB106-Yageo-datasheet-151948686.pdf?src-supplier=Farnell, Halogen Free="Halogen Free", Item Type=Capacitors, Lead Free="Lead Free", Length=0.126inch, Manufacturer Part Number=CC1210KKX7R9BB106, Mounting Technology="Surface Mount", Packaging="Cut Tape", RoHS=Yes, RoHS Compliant=Yes, Series=CC, Stock=76, Supplier=Farnell, Thickness=0.11inch, Voltage Rating (DC)=50V, Width=0.098inch
C9 C10 C32: library part GRM21BZ71A226ME15L, "CAP CER 22UF 10V X7R 0805", LCSC Part Number=C907991, Manufacturer=Murata, Max Operating Temperature=125°C, Min Operating Temperature=-55°C, Package=0805, Supplier Part Number=490-GRM21BZ71A226ME15LCT-ND, Tolerance=20%, Voltage Rating=10V, Category="Ceramic Capacitors", ComponentLink1Description=https://datasheet.octopart.com/GRM21BZ71A226ME15L-Murata-datasheet-165579666.pdf?src-supplier=TME, ComponentLink1URL=https://datasheet.octopart.com/GRM21BZ71A226ME15L-Murata-datasheet-165579666.pdf?src-supplier=TME, ComponentLink2Description=LCSC, ComponentLink2URL=https://www.lcsc.com/product-detail/Multilayer-Ceramic-Capacitors-MLCC-SMD-SMT_Murata-Electronics-GRM21BZ71A226ME15L_C907991.html, Height=1.45mm, Item Type=Capacitor, Length=2mm, Manufacturer Part Number=GRM21BZ71A226ME15L, Material=4241ConductorMaterial, Pricing="1=0.39, 10=0.259, 50=0.191, 100=0.1556, 500=0.12282, 1000=0.10372 (USD)", RoHS=Yes, Stock=49126, Supplier=Digi-Key, Thickness=1.25mm, Width=1.25mm
C22 C30 C33 C34 C35 C37 C38 C39 C45 C78: library part CC0402JRX7R7BB104, "CAP CER 0.1UF 16V X7R 0402", Case Code (Imperial)=0402, Case Code (Metric)=1005, Dielectric=X7R, LCSC Part Number=C541464, Manufacturer=Yageo, Max Operating Temperature=125°C, Min Operating Temperature=-55°C, Package Quantity=10000, Supplier Part Number=311-1676-1-ND, Tolerance=5%, Voltage Rating=16V, Case/Package=0402, Category="Ceramic Capacitors", ComponentLink1Description=https://datasheet.ciiva.com/13210/upy-gphc-x7r-6-3v-to-50v-8-12304-13210152.pdf?src-supplier=Mouser, ComponentLink1URL=https://datasheet.ciiva.com/13210/upy-gphc-x7r-6-3v-to-50v-8-12304-13210152.pdf?src-supplier=Mouser, Construction=Flat, Halogen Free="Halogen Free", Height=0.5mm, Item Type=Capacitor, Lead Free="Lead Free", Length=0.039inch, Manufacturer Part Number=CC0402JRX7R7BB104, Material=4241ConductorMaterial, Mounting Technology="Surface Mount", Packaging="Tape and Reel", Pricing="1=0.1, 10=0.046, 50=0.0262, 100=0.0203, 500=0.01528, 1000=0.012, 2500=0.01091, 5000=0.01004 (USD)", RoHS=Yes, RoHS Compliant=Yes, Series=CC, Stock=1659111, Supplier=Digikey, Thickness=0.022inch, Voltage Rating (DC)=16V, Width=0.02inch
C27: library part 20SVPF120M, "CAP ALUM POLY 120UF 20% 20V SMD", Case/Package=Radial, ESR (Equivalent Series Resistance)=25mR, LCSC Part Number=C186713, Leakage Current=480uA, Manufacturer=Panasonic, Max Operating Temperature=105°C, Min Operating Temperature=-55°C, Package Quantity=1000, Ripple Current=3.2A, Supplier Part Number 1=P16498CT-ND, Tolerance=20%, Voltage=20V, Capacitance=120uF, Category="Aluminum Electrolytic Capacitors", ComponentLink1Description=https://datasheet.ciiva.com/24432/svpf-series-datasheet-24432811.pdf?src-supplier=Onlinecomponents.com, ComponentLink1URL=https://datasheet.ciiva.com/24432/svpf-series-datasheet-24432811.pdf?src-supplier=Onlinecomponents.com, ComponentLink2Description=https://datasheet.ciiva.com/25746/1734360-25746680.pdf?src-supplier=Farnell, ComponentLink2URL=https://datasheet.ciiva.com/25746/1734360-25746680.pdf?src-supplier=Farnell, ComponentLink3Description=https://datasheet.ciiva.com/22746/1734360-22746206.pdf?src-supplier=Element14, ComponentLink3URL=https://datasheet.ciiva.com/22746/1734360-22746206.pdf?src-supplier=Element14, ComponentLink4Description=https://datasheet.ciiva.com/46650/70324301-46650876.pdf?src-supplier=Allied+Electronics, ComponentLink4URL=https://datasheet.ciiva.com/46650/70324301-46650876.pdf?src-supplier=Allied+Electronics, Construction=Cylindrical, Diameter=6.3mm, Dissipation Factor=12%, Height=5.9mm, Height - Seated (Max)=0.236inch, Item Type=Capacitor, Lead Free="Lead Free", Length=5.9mm, Life (Hours)=5000Hour, Manufacturer Part Number=20SVPF120M, Material=Polymer, Mount="Surface Mount", Number of Pins=6, Packaging="Tape and Reel", Polarity=Polar, Pricing 1="1=1.45000, 10=1.14300, 50=0.99020, 100=0.85700, 500=0.64748 (USD)", Radiation Hardening=No, Reach SVHC Compliant=Yes, Ripple Current (AC)=3.2A, RoHS=Yes, RoHS Compliant=Yes, Series="OS-CON™, SVPF", Stock 1=50150, Supplier 1=Digi-Key, Termination=SMD/SMT, Voltage Rating=20V, Voltage Rating (DC)=20V
C29: library part GRM155R70J105KA12J, "CAP CER 1UF 6.3V X7R 0402", Case Code (Imperial)=0402, Case Code (Metric)=1005, Dielectric=X7R, LCSC Part Number=C2167130, Manufacturer=Murata, Max Operating Temperature=125°C, Min Operating Temperature=-55°C, Package Quantity=50000, Tolerance=10%, Voltage Rating=6.3V, Case/Package=0402, ComponentLink1Description=http://www.mouser.com/ds/2/281/c02e-2905.pdf?src-supplier=Mouser, ComponentLink1URL=http://www.mouser.com/ds/2/281/c02e-2905.pdf?src-supplier=Mouser, ComponentLink2Description=https://datasheet.octopart.com/GRM155R70J105KA12J-Murata-datasheet-32479577.pdf?src-supplier=Future+Electronics, ComponentLink2URL=https://datasheet.octopart.com/GRM155R70J105KA12J-Murata-datasheet-32479577.pdf?src-supplier=Future+Electronics, ComponentLink3Description=https://datasheet.octopart.com/GRM155R70J105KA12J-Murata-datasheet-155345054.pdf?src-supplier=Element14, ComponentLink3URL=https://datasheet.octopart.com/GRM155R70J105KA12J-Murata-datasheet-155345054.pdf?src-supplier=Element14, ComponentLink4Description=http://search.murata.co.jp/Ceramy/image/img/A01X/G101/ENG/GRM155R70J105KA12-01.pdf?src-supplier=Digikey, ComponentLink4URL=http://search.murata.co.jp/Ceramy/image/img/A01X/G101/ENG/GRM155R70J105KA12-01.pdf?src-supplier=Digikey, ComponentLink5Description=https://datasheet.octopart.com/GRM155R70J105KA12J-Murata-datasheet-165579666.pdf?src-supplier=TME, ComponentLink5URL=https://datasheet.octopart.com/GRM155R70J105KA12J-Murata-datasheet-165579666.pdf?src-supplier=TME, Height=550um, Item Type=Capacitors, Length=0.039inch, Manufacturer Part Number=GRM155R70J105KA12J, Material=4241ConductorMaterial, Mounting Technology="Surface Mount", Packaging="Tape and Reel", Pins=2NUMBER, Pricing="1=0.1, 10=0.01, 50=0.01, 100=0.008, 1000=0.008, 10000=0.007 (USD)", RoHS=Yes, RoHS Compliant=Yes, Series=GRM, Stock=273640, Supplier=Mouser, Termination=SMD/SMT, Thickness=0.022inch, Voltage Rating (DC)=6.3V, Weight=0.000212oz, Width=0.02inch
C31: library part RVT1E470M0505, "47uF 25V 49mA@120Hz ±20% SMD,D5xL5.4mm Aluminum Electrolytic Capacitors - SMD ROHS", LCSC Part Number=C2977553, Manufacturer=ROQANG, Package=SMD,D5xL5.4mm, ComponentLink1Description=LCSC, ComponentLink1URL=https://www.lcsc.com/product-detail/Aluminum-Electrolytic-Capacitors-SMD_ROQANG-RVT1E470M0505_C2977553.html, Item Type=Capacitor, Manufacturer Part Number=RVT1E470M0505
C40 C41: library part GRM1555C1H100JA01D, "CAP CER 10PF 50V C0G/NP0 0402", Case Code (Imperial)=0402, Case Code (Metric)=1005, Dielectric=C0G, LCSC Part Number=C76946, Manufacturer=Murata, Max Operating Temperature=125°C, Min Operating Temperature=-55°C, Package Quantity=1, Tolerance=5%, Voltage=50V, Case/Package=0402, Category="Ceramic Capacitors", ComponentLink1Description=https://datasheet.ciiva.com/2989/product-2989280.pdf?src-supplier=Avnet, ComponentLink1URL=https://datasheet.ciiva.com/2989/product-2989280.pdf?src-supplier=Avnet, ComponentLink2Description=https://datasheet.ciiva.com/18184/getdatasheetpartid-307234-18184164.pdf?src-supplier=Verical, ComponentLink2URL=https://datasheet.ciiva.com/18184/getdatasheetpartid-307234-18184164.pdf?src-supplier=Verical, ComponentLink3Description=https://datasheet.ciiva.com/29200/453545-da-01-en-vs-kondensator-0402-29200107.pdf?src-supplier=Conrad, ComponentLink3URL=https://datasheet.ciiva.com/29200/453545-da-01-en-vs-kondensator-0402-29200107.pdf?src-supplier=Conrad, ComponentLink4Description=https://datasheet.ciiva.com/7828/1666664-7828812.pdf?src-supplier=Element14, ComponentLink4URL=https://datasheet.ciiva.com/7828/1666664-7828812.pdf?src-supplier=Element14, ComponentLink5Description=https://datasheet.ciiva.com/6271/partnumbering-e-01-6271159.pdf?src-supplier=Digi-Key, ComponentLink5URL=https://datasheet.ciiva.com/6271/partnumbering-e-01-6271159.pdf?src-supplier=Digi-Key, ComponentLink6Description=https://datasheet.ciiva.com/6271/partnumbering-e-01-6271158.pdf?src-supplier=Digi-Key, ComponentLink6URL=https://datasheet.ciiva.com/6271/partnumbering-e-01-6271158.pdf?src-supplier=Digi-Key, ComponentLink7Description=https://datasheet.ciiva.com/6271/partnumbering-e-01-6271068.pdf?src-supplier=Digi-Key, ComponentLink7URL=https://datasheet.ciiva.com/6271/partnumbering-e-01-6271068.pdf?src-supplier=Digi-Key, Construction=Flat, Depth=0.5mm, Height=0.5mm, Item Type=Capacitor, Lead Free="Lead Free", Length=1mm, Manufacturer Part Number=GRM1555C1H100JA01D, Material=Ceramic, Mounting Technology="Surface Mount", Packaging="Tape and Reel", Pricing="10000=0.0034, 50000=0.0027, 100000=0.0023, 250000=0.0021 (USD)", Radiation Hardening=No, Reach SVHC Compliant=No, RoHS=Yes, RoHS Compliant=Yes, Series=GRM, Stock=3860000, Supplier="Arrow Electronics", Supplier Part Number=GRM1555C1H100JA01D, Termination=SMD/SMT, Thickness=0.022inch, Voltage Rating=50V, Voltage Rating (DC)=50V, Width=0.02inch
D1: "TVS DIODE 58VWM 93.6VC SMB", LCSC Part Number=C135085, Manufacturer=Diodes, ComponentLink1Description=https://datasheet.ciiva.com/25624/0900766b8104bed2-25624843.pdf?src-supplier=Rs, ComponentLink1URL=https://datasheet.ciiva.com/25624/0900766b8104bed2-25624843.pdf?src-supplier=Rs, ComponentLink2Description=https://datasheet.ciiva.com/15143/getdatasheetpartid-39642-15143045.pdf?src-supplier=Verical, ComponentLink2URL=https://datasheet.ciiva.com/15143/getdatasheetpartid-39642-15143045.pdf?src-supplier=Verical, ComponentLink3Description=https://datasheet.ciiva.com/4520/ds19002-4520617.pdf?src-supplier=Mouser, ComponentLink3URL=https://datasheet.ciiva.com/4520/ds19002-4520617.pdf?src-supplier=Mouser, ComponentLink4Description=https://datasheet.ciiva.com/16393/ds19002-16393005.pdf?src-supplier=Future+Electronics, ComponentLink4URL=https://datasheet.ciiva.com/16393/ds19002-16393005.pdf?src-supplier=Future+Electronics, Item Type=Diode, Manufacturer Part Number=SMBJ58A-13-F, Pricing="3000=0.0711, 9000=0.0684, 15000=0.0671, 30000=0.0655, 60000=0.063 (USD)", RoHS=Yes, Stock=6000, Supplier="Future Electronics"
D2 D15 D21 D27 D33: "26.7V 24V SOD-123 ESD and Surge Protection (TVS/ESD) ROHS", LCSC Part Number=C5571859, Manufacturer=AMAZING, Package=SOD-123, ComponentLink1Description=LCSC, ComponentLink1URL=https://www.lcsc.com/product-detail/ESD-and-Surge-Protection-TVS-ESD_AMAZING-AZ4024-01G_C5571859.html, Item Type=(TVS/ESD), Manufacturer Part Number=AZ4024-01G
D3: "18A 250W 8V 5.5V Bidirectional 5V SOD-323 ESD and Surge Protection (TVS/ESD) ROHS", LCSC Part Number=C41409246, Manufacturer=ElecSuper, Package=SOD-323, ComponentLink1Description=LCSC, ComponentLink1URL=https://www.lcsc.com/product-detail/ESD-and-Surge-Protection-TVS-ESD_ElecSuper-PESD5V0S1BA-115-ES_C41409246.html, Item Type=ESD/TVS, Manufacturer Part Number=PESD5V0S1BA,115-ES
D4: "TVS DIODE 26VWM 42.1VC SMB", LCSC Part Number=C135062, Manufacturer=Diodes, Supplier Part Number=3363900, ComponentLink1Description=https://datasheet.ciiva.com/15143/getdatasheetpartid-118169-15143570.pdf?src-supplier=Verical, ComponentLink1URL=https://datasheet.ciiva.com/15143/getdatasheetpartid-118169-15143570.pdf?src-supplier=Verical, ComponentLink2Description=https://datasheet.ciiva.com/16211/ds19002-16211003.pdf?src-supplier=Future+Electronics, ComponentLink2URL=https://datasheet.ciiva.com/16211/ds19002-16211003.pdf?src-supplier=Future+Electronics, Item Type="TVS Diodes", Manufacturer Part Number=SMBJ26A-13-F, Pricing="3000=0.0717, 9000=0.069, 15000=0.0677, 30000=0.0661, 60000=0.0635 (USD)", RoHS=Yes, Stock=9000, Supplier="Future Electronics"
D5: "30A 360W 7V 3.5V Bidirectional 3.3V SOD-323 ESD and Surge Protection (TVS/ESD) ROHS", LCSC Part Number=C41409249, Manufacturer=ElecSuper, Package=SOD-323, ComponentLink1Description=LCSC, ComponentLink1URL=https://www.lcsc.com/product-detail/ESD-and-Surge-Protection-TVS-ESD_ElecSuper-PESD3V3L1BA-N-ES_C41409249.html, Item Type=ESD/TVS, Manufacturer Part Number=PESD3V3L1BA-N-ES
D8: "30V Dual Common Cathode 1V@100mA 200mA SOT-23(TO-236) Schottky Barrier Diodes (SBD) ROHS", LCSC Part Number=C2762215, Manufacturer="Shandong Jingdao Microelectronics", Package=SOT-23(TO-236), ComponentLink1Description=LCSC, ComponentLink1URL=https://www.lcsc.com/product-detail/Schottky-Barrier-Diodes-SBD_Shandong-Jingdao-Microelectronics-BAT54C_C2762215.html, Item Type=Diode, Manufacturer Part Number=BAT54C